# Altium PCB PWR Board 10A.PcbDoc (part 4 of 10)
Units mm, origin at the board's own origin, x right, y up, seen from the top; angles counter-clockwise.
Board outline 355 x 325 mm, 4 copper layers (Top Layer, Layer 1, Layer 2, Bottom Layer), stack 1.636 mm thick; 617 components, 308 nets, 1518 pads, 1199 vias.
Unrouted connection lines stored in the file: 361.
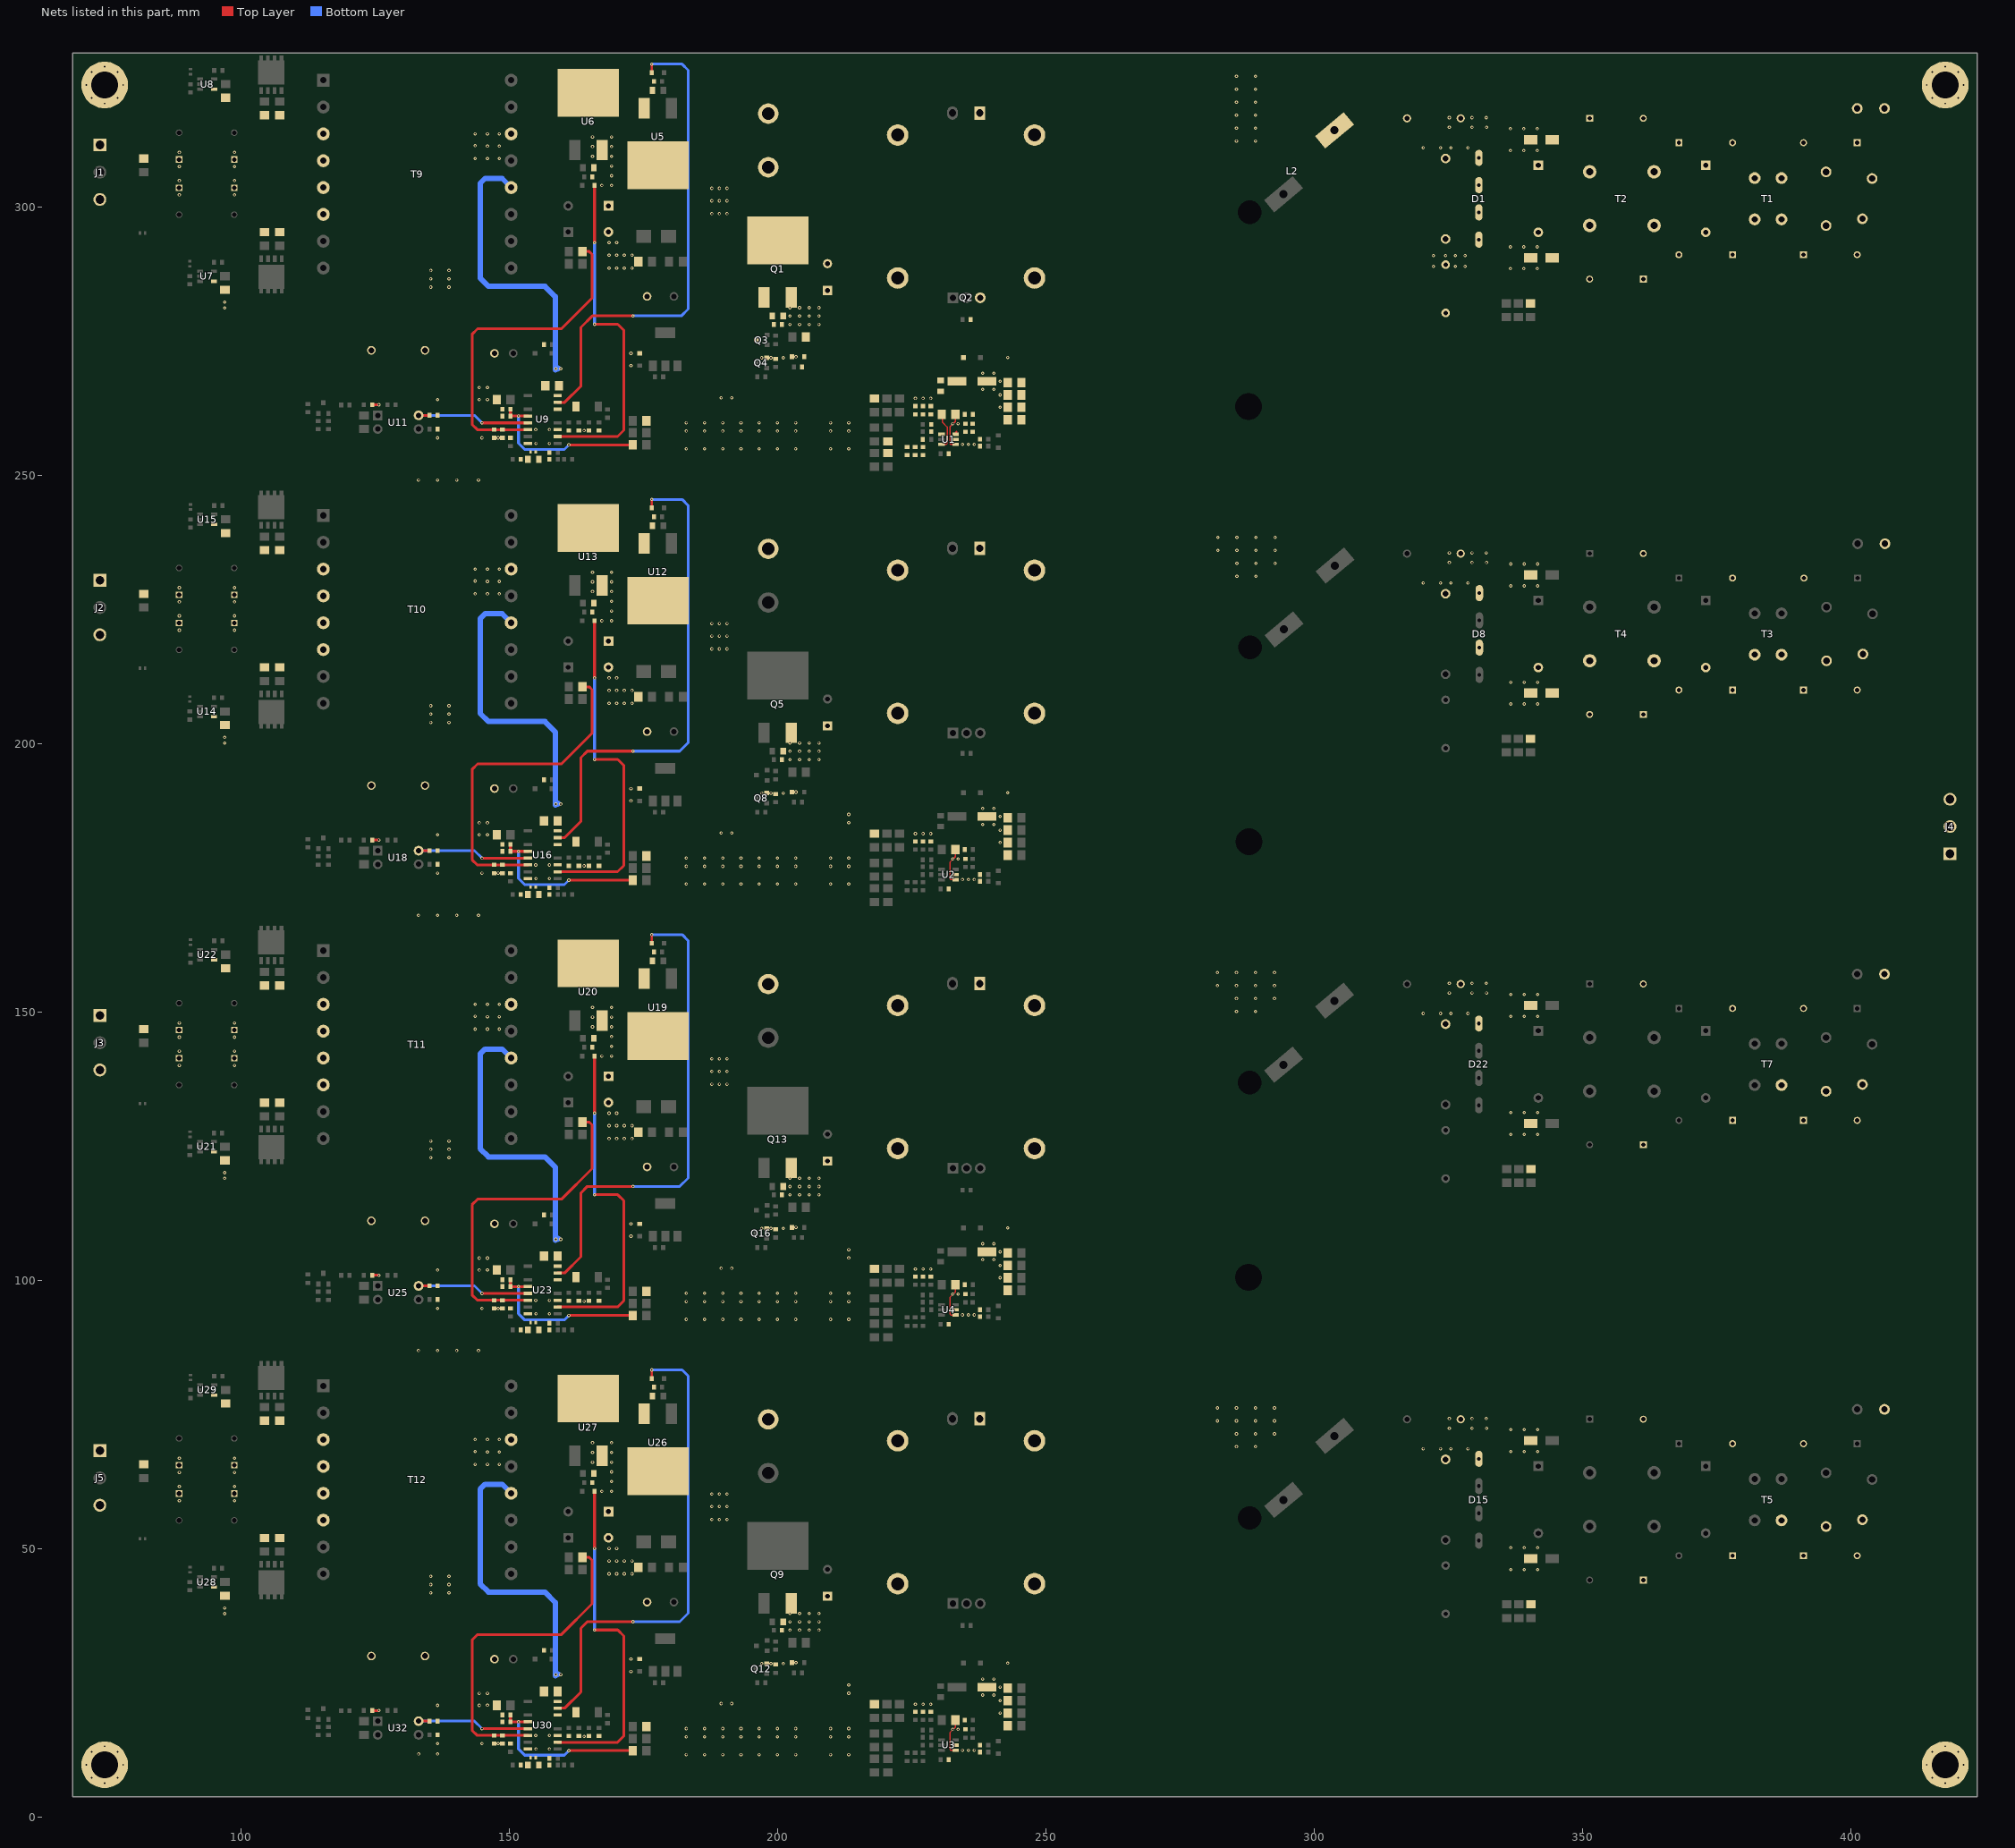
[diagram p4: the nets of this part, all layers, seen from the top]

## Part data (continued)
L2 L4 L6 L8: library part 760801401, "FIXED IND 118UH 13.9A 0.022OHM", Manufacturer="Wurth Electronics", Supplier Part Number=732-760801401-ND, Item Type=Inductors, Manufacturer Part Number=760801401, Pricing="1=18.9, 5=17.01, 10=15.12, 20=14.175, 100=13.2301 (USD)", RoHS=No, Stock=36, Supplier=Digikey
NT1 NT2 NT3 NT4: "Net Tie SMD", Manufacturer Part Number="Net Tie", Item Type="Net Tie Pad"
Q1 Q5 Q9 Q13: "MOSFET N-CH 600V 20A D2PAK", LCSC Part Number=C2688646, Manufacturer=STMicroelectronics, ComponentLink1Description=https://datasheet.ciiva.com/25625/0900766b810ea17c-25625320.pdf?src-supplier=Rs, ComponentLink1URL=https://datasheet.ciiva.com/25625/0900766b810ea17c-25625320.pdf?src-supplier=Rs, ComponentLink2Description=https://datasheet.ciiva.com/6368/cd00232934-6368742.pdf?src-supplier=Digikey, ComponentLink2URL=https://datasheet.ciiva.com/6368/cd00232934-6368742.pdf?src-supplier=Digikey, ComponentLink3Description=https://datasheet.ciiva.com/6368/cd00232934-6368743.pdf?src-supplier=Digikey, ComponentLink3URL=https://datasheet.ciiva.com/6368/cd00232934-6368743.pdf?src-supplier=Digikey, ComponentLink4Description=https://datasheet.ciiva.com/940/cd00232934-940186.pdf?src-supplier=Digikey, ComponentLink4URL=https://datasheet.ciiva.com/940/cd00232934-940186.pdf?src-supplier=Digikey, ComponentLink5Description=https://datasheet.ciiva.com/16490/cd00232934-16490237.pdf?src-supplier=Future+Electronics, ComponentLink5URL=https://datasheet.ciiva.com/16490/cd00232934-16490237.pdf?src-supplier=Future+Electronics, Item Type=MOSFETs, Manufacturer Part Number=STB26NM60N, Pricing="1=5.74, 10=3.91, 50=3.91, 100=3.5, 1000=3.49, 10000=3.49 (USD)", RoHS=Yes, Stock=642, Supplier=Mouser
Q2 Q6 Q10 Q14: "MOSFET N-CH 600V 22A TO220-3", LCSC Part Number=C537192, Manufacturer=Infineon, ComponentLink1Description=http://www.mouser.com/ds/2/196/Infineon-IPP60R099C7-DS-v02_00-EN-1076845.pdf?src-supplier=Mouser, ComponentLink1URL=http://www.mouser.com/ds/2/196/Infineon-IPP60R099C7-DS-v02_00-EN-1076845.pdf?src-supplier=Mouser, ComponentLink2Description=https://www.infineon.com/dgdl/Infineon-IPP60R099C7-DS-v02_00-EN.pdf?fileId=5546d4624cb7f111014d481216877004&src-supplier=Digikey, ComponentLink2URL=https://www.infineon.com/dgdl/Infineon-IPP60R099C7-DS-v02_00-EN.pdf?fileId=5546d4624cb7f111014d481216877004&src-supplier=Digikey, Item Type=MOSFETs, Manufacturer Part Number=IPP60R099C7XKSA1, Pricing="1=5.39, 10=4.84, 50=4.78, 100=4.69, 1000=2.27, 10000=2.27 (USD)", RoHS=Yes, Stock=617, Supplier=Mouser
Q3 Q7 Q11 Q15: "MOSFET P-CH 60V 1.6A SOT23-3", Case/Package=SOT-23-3, Continuous Drain Current (ID)=1.2A, Drain to Source Resistance=345mR, Drain to Source Voltage (Vdss)=60V, Gate to Source Voltage (Vgs)=20V, Input Capacitance=210pF, LCSC Part Number=C553975, Manufacturer="Vishay Siliconix", Max Operating Temperature=150°C, Max Power Dissipation=1.7W, Min Operating Temperature=-55°C, Package Quantity=3000, Power Dissipation=1W, Threshold Voltage=-1V, ComponentLink1Description=https://datasheet.ciiva.com/16217/si2309cd-16217597.pdf?src-supplier=Future+Electronics, ComponentLink1URL=https://datasheet.ciiva.com/16217/si2309cd-16217597.pdf?src-supplier=Future+Electronics, ComponentLink2Description=https://datasheet.ciiva.com/29742/si2309cd-29742879.pdf?src-supplier=Digikey, ComponentLink2URL=https://datasheet.ciiva.com/29742/si2309cd-29742879.pdf?src-supplier=Digikey, Drain-source On Resistance-Max=345mR, Fall Time=35ns, Height=1.02mm, Item Type=MOSFETs, Lead Free="Lead Free", Length=3.04mm, Manufacturer Part Number=SI2309CDS-T1-E3, Mounting Technology="Surface Mount", Number of Channels=1, Packaging="Tape and Reel", Pins=3, Polarity=P-CHANNEL, Pricing="1=0.53, 10=0.453, 50=0.453, 100=0.316, 1000=0.2, 10000=0.157 (USD)", Radiation Hardening=No, Rds On Max=345mR, Rise Time=35ns, RoHS=Yes, RoHS Compliant=Yes, Series=TrenchFET®, Stock=57582, Supplier=Mouser, Turn-Off Delay Time=15ns, Turn-On Delay Time=40ns, Weight=0.050717oz, Width=1.4mm
Q4 Q8 Q12 Q16: "TRANS NPN 40V 0.6A SOT23-3", LCSC Part Number=C151826, Manufacturer=Diodes, ComponentLink1Description=https://datasheet.ciiva.com/15139/getdatasheetpartid-91436-15139165.pdf?src-supplier=Verical, ComponentLink1URL=https://datasheet.ciiva.com/15139/getdatasheetpartid-91436-15139165.pdf?src-supplier=Verical, ComponentLink2Description=https://datasheet.ciiva.com/972/ds30039-972547.pdf?src-supplier=Digikey, ComponentLink2URL=https://datasheet.ciiva.com/972/ds30039-972547.pdf?src-supplier=Digikey, ComponentLink3Description=https://datasheet.ciiva.com/972/ds30039-972548.pdf?src-supplier=Digikey, ComponentLink3URL=https://datasheet.ciiva.com/972/ds30039-972548.pdf?src-supplier=Digikey, ComponentLink4Description=https://datasheet.ciiva.com/972/ds30039-972549.pdf?src-supplier=Digikey, ComponentLink4URL=https://datasheet.ciiva.com/972/ds30039-972549.pdf?src-supplier=Digikey, ComponentLink5Description=https://datasheet.ciiva.com/11201/ds30039-11201820.pdf?src-supplier=Avnet, ComponentLink5URL=https://datasheet.ciiva.com/11201/ds30039-11201820.pdf?src-supplier=Avnet, ComponentLink6Description=https://datasheet.ciiva.com/16199/ds30039-16199054.pdf?src-supplier=Future+Electronics, ComponentLink6URL=https://datasheet.ciiva.com/16199/ds30039-16199054.pdf?src-supplier=Future+Electronics, Item Type=BJTs, Manufacturer Part Number=MMBT4401-7-F, Pricing="3000=0.0119, 12000=0.0113, 30000=0.011, 75000=0.0107, 120000=0.0102 (USD)", RoHS=Yes, Stock=1359000, Supplier="Future Electronics"
Q17 Q19 Q20 Q22 Q23 Q25 Q26 Q28: "MOSFET N-CH 80V 100A 8VSON", LCSC Part Number=C2864118, Manufacturer="Texas Instruments", Package="8-VSON-CLIP (5x6)", ComponentLink1Description=LCSC, ComponentLink1URL=https://jlcpcb.com/partdetail/TexasInstruments-CSD19502Q5B/C2864118, Item Type=Mosfet, Manufacturer Part Number=CSD19502Q5B
Q18 Q21 Q24 Q27: "TRANS NPN 60V 3A SOT223-3", Case/Package=SOT-223, Clock Frequency=175MHz, Collector Base Voltage (VCBO)=80V, Collector Emitter Breakdown Voltage=60V, Collector Emitter Saturation Voltage=430mV, Collector-emitter Voltage-Max=600mV, Continuous Collector Current=3A, Emitter Base Voltage (VEBO)=5V, LCSC Part Number=C24098, Manufacturer="Diodes Zetex", Max Operating Temperature=150°C, Max Power Dissipation=2W, Min Operating Temperature=-55°C, Package Quantity=1, Collector Emitter Voltage (VCEO)=60V, ComponentLink1Description=https://datasheet.ciiva.com/5782/73067-5782650.pdf?src-supplier=Farnell, ComponentLink1URL=https://datasheet.ciiva.com/5782/73067-5782650.pdf?src-supplier=Farnell, ComponentLink2Description=https://datasheet.ciiva.com/8029/73067-8029643.pdf?src-supplier=Element14, ComponentLink2URL=https://datasheet.ciiva.com/8029/73067-8029643.pdf?src-supplier=Element14, ComponentLink3Description=https://datasheet.ciiva.com/4723/fzt651-4723319.pdf?src-supplier=Mouser, ComponentLink3URL=https://datasheet.ciiva.com/4723/fzt651-4723319.pdf?src-supplier=Mouser, ComponentLink4Description=https://datasheet.ciiva.com/975/fzt651-975544.pdf?src-supplier=Digikey, ComponentLink4URL=https://datasheet.ciiva.com/975/fzt651-975544.pdf?src-supplier=Digikey, Current=3A, Current Rating=3A, Frequency=175MHz, Gain Bandwidth Product=175MHz, Height=1.65mm, hFE Min=100, Item Type=BJTs, Lead Free="Lead Free", Length=6.7mm, Manufacturer Part Number=FZT651TA, Max Breakdown Voltage=60V, Max Collector Current=3A, Mounting Technology="Surface Mount", Number of Elements=1, Packaging="Tape and Reel", Pins=4, Polarity=NPN, Power Dissipation=2W, Pricing="1000=0.265, 3000=0.255, 4000=0.25, 10000=0.245, 15000=0.24 (USD)", Radiation Hardening=No, Reach SVHC Compliant=No, RoHS=Yes, RoHS Compliant=Yes, Series=-, Stock=670000, Supplier="Future Electronics", Termination=SMD/SMT, Transition Frequency=175MHz, Voltage=60V, Voltage Rating (DC)=60V, Weight=0.000282oz, Width=3.7mm
R1 R4 R27 R30 R53 R56 R79 R82: library part RC1206FR-073M09L, "RES 3.09M OHM 1% 1/4W 1206", Case Code (Imperial)=1206, Case Code (Metric)=3216, LCSC Part Number=C488771, Manufacturer=Yageo, Max Operating Temperature=155°C, Max Power Dissipation=250mW, Min Operating Temperature=-55°C, Package Quantity=1, Temperature Coefficient=100ppm/°C, Tolerance=1%, Voltage Rating (DC)=200V, Case/Package=1206, ComponentLink1Description=https://datasheet.ciiva.com/2461/pyu-rc1206-51-rohs-l-4-2461290.pdf?src-supplier=Digikey, ComponentLink1URL=https://datasheet.ciiva.com/2461/pyu-rc1206-51-rohs-l-4-2461290.pdf?src-supplier=Digikey, ComponentLink2Description=https://datasheet.ciiva.com/2461/pyu-rc1206-51-rohs-l-4-2461291.pdf?src-supplier=Digikey, ComponentLink2URL=https://datasheet.ciiva.com/2461/pyu-rc1206-51-rohs-l-4-2461291.pdf?src-supplier=Digikey, ComponentLink3Description=https://datasheet.ciiva.com/2461/pyu-rc1206-51-rohs-l-4-2461292.pdf?src-supplier=Digikey, ComponentLink3URL=https://datasheet.ciiva.com/2461/pyu-rc1206-51-rohs-l-4-2461292.pdf?src-supplier=Digikey, Contact Plating=Tin,Matte, Features="Moisture Resistant", Height=0.026inch, Item Type=Resistor, Lead Free="Lead Free", Length=0.122inch, Manufacturer Part Number=RC1206FR-073M09L, Number of Terminations=2, Packaging="Cut Tape", Pricing="1=0.1, 10=0.025, 50=0.025, 100=0.015, 1000=0.013, 10000=0.01 (USD)", RoHS=Yes, RoHS Compliant=Yes, Series=RC, Stock=10394, Supplier=Mouser, Width=0.063inch
R2 R28 R54 R80: library part RC0805FR-071ML, "RES 1M OHM 1% 1/8W 0805", Case Code (Imperial)=0805, Case Code (Metric)=2012, Case/Package=Molded, LCSC Part Number=C107700, Manufacturer=Yageo, Max Operating Temperature=155°C, Min Operating Temperature=-55°C, Power Rating=125mW, Resistance Tolerance=1%, Resistor Type="Thick Film", Supplier Part Number=7283393, Temperature Coefficient=250ppm/°C, Voltage Rating=150V, Category="Chip SMD Resistors", Construction=Rectangular, Depth=1.25mm, Item Type=Resistor, Lead Free="Lead Free", Length=2mm, Manufacturer Part Number=RC0805FR-071ML, Military Standard=Not, Packaging="Tape and Reel", Pricing="5000=0.0027, 25000=0.0025, 125000=0.0024, 500000=0.0023, 1250000=0.0021 (USD)", Reach SVHC Compliant=Unknown, RoHS=Yes, RoHS Compliant=Yes, Stock=2655000, Supplier="Future Electronics", Tolerance=1%, Voltage Rating (AC)=150V
R3 R6 R7 R10 R29 R32 R33 R36 R55 R58 R59 R62 R81 R84 R85 R88: library part RC1206FR-073M3L, "RES 3.3M OHM 1% 1/4W 1206", LCSC Part Number=C137288, Manufacturer=Yageo, Voltage Rating (AC)=200V, ComponentLink1Description=https://datasheet.ciiva.com/11809/0900766b80c6630a-11809505.pdf?src-supplier=Rs, ComponentLink1URL=https://datasheet.ciiva.com/11809/0900766b80c6630a-11809505.pdf?src-supplier=Rs, ComponentLink2Description=https://datasheet.ciiva.com/2511/pyu-rc1206-51-rohs-l-4-2511094.pdf?src-supplier=Digikey, ComponentLink2URL=https://datasheet.ciiva.com/2511/pyu-rc1206-51-rohs-l-4-2511094.pdf?src-supplier=Digikey, ComponentLink3Description=https://datasheet.ciiva.com/2511/pyu-rc1206-51-rohs-l-4-2511095.pdf?src-supplier=Digikey, ComponentLink3URL=https://datasheet.ciiva.com/2511/pyu-rc1206-51-rohs-l-4-2511095.pdf?src-supplier=Digikey, ComponentLink4Description=https://datasheet.ciiva.com/2511/pyu-rc1206-51-rohs-l-4-2511096.pdf?src-supplier=Digikey, ComponentLink4URL=https://datasheet.ciiva.com/2511/pyu-rc1206-51-rohs-l-4-2511096.pdf?src-supplier=Digikey, ComponentLink5Description=https://datasheet.ciiva.com/17420/pyu-rc1206-51-rohs-l-4-17420140.pdf?src-supplier=Future+Electronics, ComponentLink5URL=https://datasheet.ciiva.com/17420/pyu-rc1206-51-rohs-l-4-17420140.pdf?src-supplier=Future+Electronics, Item Type=Resistor, Manufacturer Part Number=RC1206FR-073M3L, Pricing="5000=0.0038, 20000=0.0036, 75000=0.0034, 200000=0.0032, 500000=0.003 (USD)", RoHS=Yes, Stock=130000, Supplier="Future Electronics"
R5 R31 R57 R83 R105 R110 R135 R140 R165 R170 R195 R200: library part CRCW060310R0FKEA, "RES SMD 10 OHM 1% 1/10W 0603", Case Code (Imperial)=0603, Case Code (Metric)=1608, LCSC Part Number=C844919, Manufacturer=Vishay, Max Operating Temperature=155°C, Max Power Dissipation=100mW, Min Operating Temperature=-55°C, Package Quantity=10, Resistance Tolerance=1%, Resistor Type="Thick Film", Temperature Coefficient=100ppm/°C, Voltage Rating=75V, Case/Package=0603, ComponentLink1Description=https://datasheet.ciiva.com/11808/0900766b80d98afc-11808660.pdf?src-supplier=Rs, ComponentLink1URL=https://datasheet.ciiva.com/11808/0900766b80d98afc-11808660.pdf?src-supplier=Rs, ComponentLink2Description=https://datasheet.ciiva.com/26316/fld-crcw-e3-data-en-26316582.pdf?src-supplier=Distrelec, ComponentLink2URL=https://datasheet.ciiva.com/26316/fld-crcw-e3-data-en-26316582.pdf?src-supplier=Distrelec, ComponentLink3Description=https://datasheet.ciiva.com/2465/dcrcwe3-2465700.pdf?src-supplier=Digikey, ComponentLink3URL=https://datasheet.ciiva.com/2465/dcrcwe3-2465700.pdf?src-supplier=Digikey, ComponentLink4Description=https://datasheet.ciiva.com/16781/70201119-16781847.pdf?src-supplier=Allied+Electronics, ComponentLink4URL=https://datasheet.ciiva.com/16781/70201119-16781847.pdf?src-supplier=Allied+Electronics, ComponentLink5Description=https://datasheet.ciiva.com/22673/1697337-22673071.pdf?src-supplier=Element14, ComponentLink5URL=https://datasheet.ciiva.com/22673/1697337-22673071.pdf?src-supplier=Element14, ComponentLink6Description=https://datasheet.ciiva.com/2465/dcrcwe3-2465701.pdf?src-supplier=Digikey, ComponentLink6URL=https://datasheet.ciiva.com/2465/dcrcwe3-2465701.pdf?src-supplier=Digikey, ComponentLink7Description=https://datasheet.ciiva.com/2465/dcrcwe3-2465699.pdf?src-supplier=Digikey, ComponentLink7URL=https://datasheet.ciiva.com/2465/dcrcwe3-2465699.pdf?src-supplier=Digikey, ComponentLink8Description=https://datasheet.ciiva.com/5547/dcrcwe3-109170-5547342.pdf?src-supplier=Mouser, ComponentLink8URL=https://datasheet.ciiva.com/5547/dcrcwe3-109170-5547342.pdf?src-supplier=Mouser, Construction=Rectangular, Contact Plating=Tin, Depth=0.85mm, Features="Automotive AEC-Q200", Height=0.45mm, Item Type=Resistors, Lead Free=5697LeadFree, Length=1.55mm, Manufacturer Part Number=CRCW060310R0FKEA, Military Standard=Not, Number of Terminations=2, Packaging="Tape and Reel", Pins=2, Power Rating=100mW, Pricing="1=0.1, 10=0.017, 50=0.017, 100=0.01, 1000=0.008, 10000=0.005 (USD)", Reach SVHC Compliant=Unknown, RoHS=Yes, RoHS Compliant=Yes, Series=CRCW, Stock=648208, Supplier=Mouser, Technology="THICK FILM", Termination=SMD/SMT, Tolerance=1%, Voltage Rating (DC)=75V, Weight=7.1E-05oz, Width=0.033inch
R8 R34 R60 R86: library part CRCW06031R00FKEA, "RES SMD 1 OHM 1% 1/10W 0603", Case Code (Imperial)=0603, Case Code (Metric)=1608, LCSC Part Number=C844752, Manufacturer="Vishay Dale", Max Operating Temperature=155°C, Max Power Dissipation=100mW, Min Operating Temperature=-55°C, Package Quantity=5000, Ratings=AEC-Q200, Resistance Tolerance=1%, Resistor Type="Thick Film", Temperature Coefficient=100ppm/°C, Voltage Rating=75V, Case/Package=0603, ComponentLink1Description=https://datasheet.ciiva.com/7792/1359337-7792119.pdf?src-supplier=Element14, ComponentLink1URL=https://datasheet.ciiva.com/7792/1359337-7792119.pdf?src-supplier=Element14, ComponentLink2Description=https://datasheet.ciiva.com/3257/dcrcwe3-3257225.pdf?src-supplier=Avnet, ComponentLink2URL=https://datasheet.ciiva.com/3257/dcrcwe3-3257225.pdf?src-supplier=Avnet, ComponentLink3Description=https://datasheet.ciiva.com/2465/dcrcwe3-2465530.pdf?src-supplier=Digikey, ComponentLink3URL=https://datasheet.ciiva.com/2465/dcrcwe3-2465530.pdf?src-supplier=Digikey, ComponentLink4Description=https://datasheet.ciiva.com/2465/dcrcwe3-2465528.pdf?src-supplier=Digikey, ComponentLink4URL=https://datasheet.ciiva.com/2465/dcrcwe3-2465528.pdf?src-supplier=Digikey, ComponentLink5Description=https://datasheet.ciiva.com/5541/dcrcwe3-109170-5541726.pdf?src-supplier=Mouser, ComponentLink5URL=https://datasheet.ciiva.com/5541/dcrcwe3-109170-5541726.pdf?src-supplier=Mouser, Construction=Rectangular, Contact Plating=Tin, Depth=0.85mm, Features="Automotive AEC-Q200", Height=0.45mm, Item Type=Resistor, Lead Free=5697LeadFree, Length=1.55mm, Manufacturer Part Number=CRCW06031R00FKEA, Military Standard=Not, Number of Terminations=2, Packaging="Tape and Reel", Pins=2, Power Rating=100mW, Pricing="1=0.1, 10=0.024, 50=0.024, 100=0.014, 1000=0.011, 10000=0.006 (USD)", Radiation Hardening=No, Reach SVHC Compliant=Unknown, RoHS=Yes, RoHS Compliant=Yes, Series=CRCW, Stock=303523, Supplier=Mouser, Termination=SMD/SMT, Tolerance=1%, Voltage Rating (DC)=75V, Weight=7.1E-05oz, Width=0.85mm
R9 R35 R61 R87: library part RC0603FR-0782K5L, "RES 82.5K OHM 1% 1/10W 0603", LCSC Part Number=C185310, Manufacturer=Yageo, Voltage Rating (DC)=50V, ComponentLink1Description=https://datasheet.ciiva.com/2519/pyu-r-int-thick-7-2519111.pdf?src-supplier=Digikey, ComponentLink1URL=https://datasheet.ciiva.com/2519/pyu-r-int-thick-7-2519111.pdf?src-supplier=Digikey, ComponentLink2Description=https://datasheet.ciiva.com/2519/pyu-r-int-thick-7-2519112.pdf?src-supplier=Digikey, ComponentLink2URL=https://datasheet.ciiva.com/2519/pyu-r-int-thick-7-2519112.pdf?src-supplier=Digikey, ComponentLink3Description=https://datasheet.ciiva.com/2519/pyu-r-int-thick-7-2519113.pdf?src-supplier=Digikey, ComponentLink3URL=https://datasheet.ciiva.com/2519/pyu-r-int-thick-7-2519113.pdf?src-supplier=Digikey, Item Type=Resistor, Lead Free=5697LeadFree, Manufacturer Part Number=RC0603FR-0782K5L, Pricing="5000=0.00112 (USD)", RoHS=Yes, Stock=165000, Supplier=Avnet
R11 R37 R63 R89: library part RC0603FR-0736K5L, "RES 36.5K OHM 1% 1/10W 0603", LCSC Part Number=C137738, Manufacturer=YAGEO, Package=0603, ComponentLink1Description=LCSC, ComponentLink1URL=https://www.lcsc.com/product-detail/Chip-Resistor-Surface-Mount_YAGEO-RC0603FR-0736K5L_C137738.html, Item Type=Resistor, Manufacturer Part Number=RC0603FR-0736K5L
R12 R38 R64 R90: library part RC0603FR-07120KL, "RES 120K OHM 1% 1/10W 0603", Case Code (Imperial)=0603, Case Code (Metric)=1608, LCSC Part Number=C114607, Manufacturer=Yageo, Max Operating Temperature=155°C, Max Power Dissipation=100mW, Min Operating Temperature=-55°C, Package Quantity=5000, Resistance Tolerance=1%, Resistor Type="Thick Film", Temperature Coefficient=100ppm/°C, Voltage Rating=50V, Working Voltage=75V, Case/Package=0603, ComponentLink1Description=https://datasheet.ciiva.com/11808/0900766b80f96399-11808757.pdf?src-supplier=Rs, ComponentLink1URL=https://datasheet.ciiva.com/11808/0900766b80f96399-11808757.pdf?src-supplier=Rs, ComponentLink2Description=https://datasheet.ciiva.com/2454/pyu-r-int-thick-7-2454739.pdf?src-supplier=Digikey, ComponentLink2URL=https://datasheet.ciiva.com/2454/pyu-r-int-thick-7-2454739.pdf?src-supplier=Digikey, ComponentLink3Description=https://datasheet.ciiva.com/2454/pyu-r-int-thick-7-2454740.pdf?src-supplier=Digikey, ComponentLink3URL=https://datasheet.ciiva.com/2454/pyu-r-int-thick-7-2454740.pdf?src-supplier=Digikey, ComponentLink4Description=https://datasheet.ciiva.com/2454/pyu-r-int-thick-7-2454738.pdf?src-supplier=Digikey, ComponentLink4URL=https://datasheet.ciiva.com/2454/pyu-r-int-thick-7-2454738.pdf?src-supplier=Digikey, ComponentLink5Description=https://datasheet.ciiva.com/7746/443971-7746247.pdf?src-supplier=Element14, ComponentLink5URL=https://datasheet.ciiva.com/7746/443971-7746247.pdf?src-supplier=Element14, ComponentLink6Description=https://datasheet.ciiva.com/7746/443971-7746246.pdf?src-supplier=Element14, ComponentLink6URL=https://datasheet.ciiva.com/7746/443971-7746246.pdf?src-supplier=Element14, Depth=0.8mm, Features="Moisture Resistant", Height=0.022inch, Item Type=Resistors, Lead Free=5697LeadFree, Lead Pitch=2.54mm, Length=0.063inch, Manufacturer Part Number=RC0603FR-07120KL, Number of Terminations=2, Packaging="Tape and Reel", Pins=2, Power Rating=100mW, Pricing="5000=0.0022, 50000=0.0021, 150000=0.0021, 375000=0.002, 1000000=0.0019 (USD)", Radiation Hardening=5898YesNo, Reach SVHC Compliant=Unknown, RoHS=Yes, RoHS Compliant=Yes, Series=RC, Stock=3405000, Supplier="Future Electronics", Technology="THICK FILM", Termination=SMD/SMT, Tolerance=1%, Voltage Rating (AC)=50V, Voltage Rating (DC)=50V, Width=0.031inch
R13 R39 R65 R91: library part RC0603FR-073KL, "RES 3K OHM 1% 1/10W 0603", Case Code (Imperial)=0603, Case Code (Metric)=1608, LCSC Part Number=C126358, Manufacturer=Yageo, Max Operating Temperature=155°C, Max Power Dissipation=100mW, Min Operating Temperature=-55°C, Resistance Tolerance=1%, Resistor Type="Thick Film", Temperature Coefficient=100ppm/°C, Voltage Rating=50V, Case/Package=0603, ComponentLink1Description=http://www.farnell.com/datasheets/2167052.pdf?src-supplier=Farnell, ComponentLink1URL=http://www.farnell.com/datasheets/2167052.pdf?src-supplier=Farnell, ComponentLink2Description=http://www.mouser.com/ds/2/447/RC0603-272842.pdf?src-supplier=Mouser, ComponentLink2URL=http://www.mouser.com/ds/2/447/RC0603-272842.pdf?src-supplier=Mouser, ComponentLink3Description=https://www.verical.com/server-webapp/html/getDatasheet?partID=135099&src-supplier=Verical, ComponentLink3URL=https://www.verical.com/server-webapp/html/getDatasheet?partID=135099&src-supplier=Verical, ComponentLink4Description=http://www.farnell.com/datasheets/2167052.pdf?src-supplier=Element14, ComponentLink4URL=http://www.farnell.com/datasheets/2167052.pdf?src-supplier=Element14, ComponentLink5Description=http://www.yageo.com/documents/recent/PYu-RC_Group_51_RoHS_L_10.pdf?src-supplier=Digikey, ComponentLink5URL=http://www.yageo.com/documents/recent/PYu-RC_Group_51_RoHS_L_10.pdf?src-supplier=Digikey, ComponentLink6Description=http://www.yageo.com/documents/recent/PYu-RC_Group_51_RoHS_L_9.pdf?src-supplier=Digikey, ComponentLink6URL=http://www.yageo.com/documents/recent/PYu-RC_Group_51_RoHS_L_9.pdf?src-supplier=Digikey, ComponentLink7Description=https://datasheet.octopart.com/RC0603FR-073KL-Yageo-datasheet-8328172.pdf?src-supplier=Farnell, ComponentLink7URL=https://datasheet.octopart.com/RC0603FR-073KL-Yageo-datasheet-8328172.pdf?src-supplier=Farnell, ComponentLink8Description=http://www.yageo.com/documents/recent/PYu-RC0603_51_RoHS_L_7.pdf?src-supplier=Future+Electronics, ComponentLink8URL=http://www.yageo.com/documents/recent/PYu-RC0603_51_RoHS_L_7.pdf?src-supplier=Future+Electronics, ComponentLink9Description=https://datasheet.octopart.com/RC0603FR-073KL-Yageo-datasheet-34211833.pdf?src-supplier=Element14, ComponentLink9URL=https://datasheet.octopart.com/RC0603FR-073KL-Yageo-datasheet-34211833.pdf?src-supplier=Element14, ComponentLink10Description=http://www.farnell.com/datasheets/1868787.pdf?src-supplier=Newark, ComponentLink10URL=http://www.farnell.com/datasheets/1868787.pdf?src-supplier=Newark, ComponentLink11Description=https://datasheet.octopart.com/RC0603FR-073KL-Yageo-datasheet-164759695.pdf?src-supplier=Future+Electronics, ComponentLink11URL=https://datasheet.octopart.com/RC0603FR-073KL-Yageo-datasheet-164759695.pdf?src-supplier=Future+Electronics, Construction=Rectangular, Depth=0.8mm, Features="Moisture Resistant", Item Type=Resistor, Lead Free=5697LeadFree, Length=1.6mm, Manufacturer Part Number=RC0603FR-073KL, Military Standard=Not, Number of Terminations=2, Packaging="Tape and Reel", Pins=2NUMBER, Power Rating=100mW, Reach SVHC Compliant=No, RoHS=Yes, RoHS Compliant=Yes, Series=RC, Supplier=Avnet, Termination=SMD/SMT, Tolerance=1%, Voltage Rating (DC)=50V, Width=800um
R14 R40 R66 R92: library part CRCW080510R0FKEAHP, "RES SMD 10 OHM 1% 1/2W 0805", Case Code (Imperial)=0805, Case Code (Metric)=2012, LCSC Part Number=C844598, Manufacturer=Vishay, Max Operating Temperature=155°C, Max Power Dissipation=333mW, Min Operating Temperature=-55°C, Package Quantity=5000, Power Rating=330mW, Ratings=AEC-Q200, Resistance Tolerance=1%, Resistor Type="Thick Film", Temperature Coefficient=100ppm/°C, Voltage Rating=150V, Case/Package=0805, ComponentLink1Description=http://www.farnell.com/datasheets/2884039.pdf?src-supplier=Newark, ComponentLink1URL=http://www.farnell.com/datasheets/2884039.pdf?src-supplier=Newark, ComponentLink2Description=https://datasheet.octopart.com/CRCW080510R0FKEAHP-Vishay-datasheet-87136057.pdf?src-supplier=Newark, ComponentLink2URL=https://datasheet.octopart.com/CRCW080510R0FKEAHP-Vishay-datasheet-87136057.pdf?src-supplier=Newark, ComponentLink3Description=http://www.vishay.com/docs/20043/crcwhpe3.pdf?src-supplier=Digikey, ComponentLink3URL=http://www.vishay.com/docs/20043/crcwhpe3.pdf?src-supplier=Digikey, Construction=Rectangular, Contact Plating=Tin, Depth=1.25mm, Features="Automotive AEC-Q200", Height=0.5mm, Item Type=Resistor, Lead Free="Lead Free", Length=2mm, Manufacturer Part Number=CRCW080510R0FKEAHP, Military Standard=Not, Number of Terminations=2, Packaging="Tape and Reel", Pricing="1=0.19, 10=0.066, 50=0.066, 100=0.04, 1000=0.027, 10000=0.023 (USD)", Radiation Hardening=No, Reach SVHC Compliant=Unknown, RoHS=Yes, RoHS Compliant=Yes, Series=CRCW-HP, Stock=384044, Supplier=Mouser, Technology="THICK FILM", Termination=SMD/SMT, Tolerance=1%, Voltage Rating (DC)=150V, Weight=0.000194oz, Width=1.2mm
R15 R41 R67 R93: library part RC0603FR-0724K3L, "RES 24.3K OHM 1% 1/10W 0603", Manufacturer=Yageo, Supplier Part Number=6938161, Voltage Rating (DC)=50V, ComponentLink1Description=https://datasheet.ciiva.com/15189/getdatasheetpartid-326710-15189669.pdf?src-supplier=Verical, ComponentLink1URL=https://datasheet.ciiva.com/15189/getdatasheetpartid-326710-15189669.pdf?src-supplier=Verical, Item Type=Resistors, Lead Free=5697LeadFree, Manufacturer Part Number=RC0603FR-0724K3L, Pricing="5000=0.0015, 50000=0.0014, 150000=0.0014, 375000=0.0013, 1000000=0.0012 (USD)", RoHS=Yes, Stock=440000, Supplier="Future Electronics"
R16 R42 R68 R94: library part CRCW0603100KFKEA, "RES SMD 100K OHM 1% 1/10W 0603", Case Code (Imperial)=0603, Case Code (Metric)=1608, Case/Package=345Case, LCSC Part Number=C844916, Max Operating Temperature=155°C, Min Operating Temperature=-55°C, Power Rating=100mW, Resistance Tolerance=1%, Resistor Type="Thick Film", Supplier Part Number=71-CRCW0603-100K-E3, Temperature Coefficient=100ppm/°C, Voltage Rating=75V, Category="Chip SMD Resistors", ComponentLink1Description=LCSC, ComponentLink2Description=http://www.farnell.com/datasheets/2310790.pdf?src-supplier=Farnell, ComponentLink2URL=http://www.farnell.com/datasheets/2310790.pdf?src-supplier=Farnell, ComponentLink3Description=https://datasheet.octopart.com/CRCW0603100KFKEA-Vishay-datasheet-14722531.pdf?src-supplier=Newark, ComponentLink3URL=https://datasheet.octopart.com/CRCW0603100KFKEA-Vishay-datasheet-14722531.pdf?src-supplier=Newark, ComponentLink4Description=https://www.vishay.com/docs/20035/dcrcwe3.pdf?src-supplier=Digi-Key, ComponentLink4URL=https://www.vishay.com/docs/20035/dcrcwe3.pdf?src-supplier=Digi-Key, ComponentLink5Description=https://datasheet.octopart.com/CRCW0603100KFKEA-Vishay-datasheet-5300368.pdf?src-supplier=Future+Electronics, ComponentLink5URL=https://datasheet.octopart.com/CRCW0603100KFKEA-Vishay-datasheet-5300368.pdf?src-supplier=Future+Electronics, ComponentLink6Description=http://www.farnell.com/datasheets/2310790.pdf?src-supplier=Newark, ComponentLink6URL=http://www.farnell.com/datasheets/2310790.pdf?src-supplier=Newark, ComponentLink7Description=http://www.farnell.com/datasheets/2310790.pdf?src-supplier=Element14, ComponentLink7URL=http://www.farnell.com/datasheets/2310790.pdf?src-supplier=Element14, ComponentLink8Description=https://datasheet.octopart.com/CRCW0603100KFKEA-Vishay-datasheet-83961561.pdf?src-supplier=Element14, ComponentLink8URL=https://datasheet.octopart.com/CRCW0603100KFKEA-Vishay-datasheet-83961561.pdf?src-supplier=Element14, ComponentLink9Description=https://datasheet.octopart.com/CRCW0603100KFKEA-Vishay-datasheet-8363642.pdf?src-supplier=Verical, ComponentLink9URL=https://datasheet.octopart.com/CRCW0603100KFKEA-Vishay-datasheet-8363642.pdf?src-supplier=Verical, ComponentLink10Description=https://datasheet.octopart.com/CRCW0603100KFKEA-Vishay-datasheet-508714.pdf?src-supplier=Farnell, ComponentLink10URL=https://datasheet.octopart.com/CRCW0603100KFKEA-Vishay-datasheet-508714.pdf?src-supplier=Farnell, ComponentLink11Description=https://datasheet.octopart.com/CRCW0603100KFKEA-Vishay-datasheet-17834126.pdf?src-supplier=TME, ComponentLink11URL=https://datasheet.octopart.com/CRCW0603100KFKEA-Vishay-datasheet-17834126.pdf?src-supplier=TME, Features=6309FeaturesType, Height=500um, Item Type=Resistor, Lead Free=5697LeadFree, Packaging=13Packaging, Pins=2NUMBER, Pricing="1=0.1, 10=0.019, 50=0.019, 100=0.009, 1000=0.007, 10000=0.004 (USD)", RoHS=Yes, RoHS Compliant=Yes, Stock=716604, Supplier=Mouser, Tolerance=1%, Voltage Rating (DC)=75V
R17 R25 R43 R51 R69 R77 R95 R103: library part RC0603FR-07390KL, "RES 390K OHM 1% 1/10W 0603", Case Code (Imperial)=0603, Case Code (Metric)=1608, LCSC Part Number=C137735, Manufacturer=Yageo, Max Operating Temperature=155°C, Max Power Dissipation=100mW, Min Operating Temperature=-55°C, Resistance Tolerance=1%, Resistor Type="Thick Film", Temperature Coefficient=100ppm/°C, Voltage Rating=50V, Working Voltage=75V, Case/Package=0603, ComponentLink1Description=https://datasheet.ciiva.com/11819/0900766b80f96399-11819357.pdf?src-supplier=Rs, ComponentLink1URL=https://datasheet.ciiva.com/11819/0900766b80f96399-11819357.pdf?src-supplier=Rs, ComponentLink2Description=https://datasheet.ciiva.com/5557/rc0603-5557952.pdf?src-supplier=Mouser, ComponentLink2URL=https://datasheet.ciiva.com/5557/rc0603-5557952.pdf?src-supplier=Mouser, ComponentLink3Description=https://datasheet.ciiva.com/2454/pyu-r-int-thick-7-2454247.pdf?src-supplier=Digikey, ComponentLink3URL=https://datasheet.ciiva.com/2454/pyu-r-int-thick-7-2454247.pdf?src-supplier=Digikey, ComponentLink4Description=https://datasheet.ciiva.com/2454/pyu-r-int-thick-7-2454248.pdf?src-supplier=Digikey, ComponentLink4URL=https://datasheet.ciiva.com/2454/pyu-r-int-thick-7-2454248.pdf?src-supplier=Digikey, ComponentLink5Description=https://datasheet.ciiva.com/2454/pyu-r-int-thick-7-2454246.pdf?src-supplier=Digikey, ComponentLink5URL=https://datasheet.ciiva.com/2454/pyu-r-int-thick-7-2454246.pdf?src-supplier=Digikey, Construction=Rectangular, Depth=0.8mm, Features="Moisture Resistant", Height=0.45mm, Item Type=Resistor, Lead Free=5697LeadFree, Length=1.6mm, Manufacturer Part Number=RC0603FR-07390KL, Military Standard=Not, Number of Terminations=2, Packaging="Tape and Reel", Pins=2, Power Rating=100mW, Pricing="1=0.104, 25=0.011, 50=0.009, 100=0.006 (USD)", Reach SVHC Compliant=Unknown, RoHS=Yes, RoHS Compliant=Yes, Series=RC, Stock=3700, Supplier=Avnet, Technology="THICK FILM", Termination=SMD/SMT, Tolerance=1%, Voltage Rating (AC)=50V, Voltage Rating (DC)=50V, Width=0.8mm
R18 R19 R44 R45 R70 R71 R96 R97: library part RC0603FR-0775KL, "RES 75K OHM 1% 1/10W 0603", Case Code (Imperial)=0603, Case Code (Metric)=1608, LCSC Part Number=C114636, Manufacturer=Yageo, Max Operating Temperature=155°C, Max Power Dissipation=100mW, Min Operating Temperature=-55°C, Resistance Tolerance=1%, Resistor Type="Thick Film", Temperature Coefficient=100ppm/°C, Voltage Rating=50V, Case/Package=0603, ComponentLink1Description=https://datasheet.ciiva.com/11808/0900766b80f96399-11808100.pdf?src-supplier=Rs, ComponentLink1URL=https://datasheet.ciiva.com/11808/0900766b80f96399-11808100.pdf?src-supplier=Rs, ComponentLink2Description=https://datasheet.ciiva.com/15189/getdatasheetpartid-326733-15189816.pdf?src-supplier=Verical, ComponentLink2URL=https://datasheet.ciiva.com/15189/getdatasheetpartid-326733-15189816.pdf?src-supplier=Verical, ComponentLink3Description=https://datasheet.ciiva.com/2455/pyu-r-int-thick-7-2455324.pdf?src-supplier=Digikey, ComponentLink3URL=https://datasheet.ciiva.com/2455/pyu-r-int-thick-7-2455324.pdf?src-supplier=Digikey, ComponentLink4Description=https://datasheet.ciiva.com/2455/pyu-r-int-thick-7-2455325.pdf?src-supplier=Digikey, ComponentLink4URL=https://datasheet.ciiva.com/2455/pyu-r-int-thick-7-2455325.pdf?src-supplier=Digikey, ComponentLink5Description=https://datasheet.ciiva.com/2455/pyu-r-int-thick-7-2455323.pdf?src-supplier=Digikey, ComponentLink5URL=https://datasheet.ciiva.com/2455/pyu-r-int-thick-7-2455323.pdf?src-supplier=Digikey, ComponentLink6Description=https://datasheet.ciiva.com/46395/443971-46395017.pdf?src-supplier=Element14, ComponentLink6URL=https://datasheet.ciiva.com/46395/443971-46395017.pdf?src-supplier=Element14, Construction=Rectangular, Depth=0.8mm, Features="Moisture Resistant", Height=0.45mm, Item Type=Resistor, Lead Free=5697LeadFree, Length=1.6mm, Manufacturer Part Number=RC0603FR-0775KL, Military Standard=Not, Number of Terminations=2, Packaging="Tape and Reel", Pins=2NUMBER, Power Rating=100mW, Pricing="5000=0.0015, 75000=0.0015, 250000=0.0014, 750000=0.0013, 2500000=0.0012 (USD)", Reach SVHC Compliant=No, RoHS=Yes, RoHS Compliant=Yes, Series=RC, Stock=550000, Supplier="Future Electronics", Technology="THICK FILM", Termination=SMD/SMT, Tolerance=1%, Voltage Rating (DC)=50V
R20 R46 R72 R98: library part RC0603FR-07140KL, "RES 140K OHM 1% 1/10W 0603", LCSC Part Number=C185372, Manufacturer=Yageo, Voltage Rating (DC)=50V, ComponentLink1Description=https://datasheet.ciiva.com/2453/pyu-r-int-thick-7-2453916.pdf?src-supplier=Digikey, ComponentLink1URL=https://datasheet.ciiva.com/2453/pyu-r-int-thick-7-2453916.pdf?src-supplier=Digikey, ComponentLink2Description=https://datasheet.ciiva.com/2453/pyu-r-int-thick-7-2453917.pdf?src-supplier=Digikey, ComponentLink2URL=https://datasheet.ciiva.com/2453/pyu-r-int-thick-7-2453917.pdf?src-supplier=Digikey, ComponentLink3Description=https://datasheet.ciiva.com/2453/pyu-r-int-thick-7-2453918.pdf?src-supplier=Digikey, ComponentLink3URL=https://datasheet.ciiva.com/2453/pyu-r-int-thick-7-2453918.pdf?src-supplier=Digikey, Item Type=Resistor, Lead Free=5697LeadFree, Manufacturer Part Number=RC0603FR-07140KL, Pricing="5000=0.0015, 50000=0.0014, 150000=0.0014, 375000=0.0013, 1000000=0.0012 (USD)", RoHS=Yes, Stock=215000, Supplier="Future Electronics"
R21 R22 R47 R48 R73 R74 R99 R100: library part CSR1206FTR130, "500mW Thick Film Resistors ±100ppm/℃ ±1% 130mΩ 1206 Chip Resistor - Surface Mount ROHS", LCSC Part Number=C346779, Manufacturer="SEI(Stackpole Elec)", Package=1206, ComponentLink1Description=LCSC, ComponentLink1URL=https://www.lcsc.com/product-detail/Chip-Resistor-Surface-Mount_SEI-Stackpole-Elec-CSR1206FTR130_C346779.html, Item Type=Resistor, Manufacturer Part Number=CSR1206FTR130
R23 R24 R49 R50 R75 R76 R101 R102: library part RL1206FR-7W0R15L, "RES 0.15 OHM 1% 1/2W 1206", LCSC Part Number=C859925, Manufacturer=YAGEO, Package=1206, ComponentLink1Description=LCSC, ComponentLink1URL=https://www.lcsc.com/product-detail/Chip-Resistor-Surface-Mount_YAGEO-RL1206FR-7W0R15L_C859925.html, Item Type=Resistor, Manufacturer Part Number=RL1206FR-7W0R15L
R26 R52 R78 R104: library part RC0603FR-0749K9L, "RES 49.9K OHM 1% 1/10W 0603", Case Code (Imperial)=0603, Case Code (Metric)=1608, LCSC Part Number=C114624, Manufacturer=Yageo, Max Operating Temperature=155°C, Max Power Dissipation=100mW, Min Operating Temperature=-55°C, Package Quantity=1, Resistance=49.9kR, Resistor Type="Thick Film", Supplier Part Number 1=311-49.9KHRCT-ND, Temperature Coefficient=100ppm/°C, Tolerance=1%, Voltage Rating=50V, Case/Package=0603, Category="Chip SMD Resistors", ComponentLink1Description=https://datasheet.ciiva.com/2454/pyu-r-int-thick-7-2454042.pdf?src-supplier=Digi-Key, ComponentLink1URL=https://datasheet.ciiva.com/2454/pyu-r-int-thick-7-2454042.pdf?src-supplier=Digi-Key, ComponentLink2Description=https://datasheet.ciiva.com/2454/pyu-r-int-thick-7-2454043.pdf?src-supplier=Digi-Key, ComponentLink2URL=https://datasheet.ciiva.com/2454/pyu-r-int-thick-7-2454043.pdf?src-supplier=Digi-Key, ComponentLink3Description=https://datasheet.ciiva.com/2454/pyu-r-int-thick-7-2454044.pdf?src-supplier=Digi-Key, ComponentLink3URL=https://datasheet.ciiva.com/2454/pyu-r-int-thick-7-2454044.pdf?src-supplier=Digi-Key, ComponentLink4Description=https://datasheet.ciiva.com/15189/getdatasheetpartid-323805-15189749.pdf?src-supplier=Verical, ComponentLink4URL=https://datasheet.ciiva.com/15189/getdatasheetpartid-323805-15189749.pdf?src-supplier=Verical, Construction=Rectangular, Depth=0.8mm, Features="Moisture Resistant", Height=0.022inch, Item Type=Resistor, Lead Free="Lead Free", Length=0.063inch, Manufacturer Part Number=RC0603FR-0749K9L, Military Standard=Not, Mount="Surface Mount", Number of Terminations=2, Packaging="Tape and Reel", Power Rating=100mW, Pricing 1="1=0.10000, 10=0.02400, 100=0.00970, 1000=0.00436, 2500=0.00378 (USD)", RoHS=Yes, RoHS Compliant=Yes, Series=RC, Size Code=0603, Stock 1=77863, Supplier 1=Digi-Key, Termination=SMD/SMT, Voltage Rating (DC)=50V, Width=0.031inch
R106 R111 R136 R141 R166 R171 R196 R201: library part RC0805FR-7W10KL, "RES 10K OHM 1% 1/4W 0805", LCSC Part Number=C723404, Manufacturer=Yageo, Supplier Part Number=49AK3472, Category="Chip SMD Resistors", Item Type=Resistor, Manufacturer Part Number=RC0805FR-7W10KL, Pricing="1=0.153, 25=0.038, 50=0.03, 100=0.02 (USD)", RoHS=Yes, Stock=5000, Supplier=Avnet
R107 R137 R167 R197: library part CRCW12060000Z0EA, "RES SMD 0 OHM JUMPER 1/4W 1206", Case Code (Imperial)=1206, Case Code (Metric)=3216, LCSC Part Number=C190124, Manufacturer=Vishay, Max Operating Temperature=155°C, Max Power Dissipation=250mW, Min Operating Temperature=-55°C, Package Quantity=5000, Ratings=AEC-Q200, Resistor Type="Thick Film", Temperature Coefficient=100ppm/°C, Tolerance=1%, Voltage Rating=200V, Case/Package=1206, ComponentLink1Description=https://datasheet.ciiva.com/7841/1720486-7841862.pdf?src-supplier=Element14, ComponentLink1URL=https://datasheet.ciiva.com/7841/1720486-7841862.pdf?src-supplier=Element14, Construction=Rectangular, Contact Plating=Tin, Depth=1.6mm, Features="Automotive AEC-Q200", Height=0.55mm, Item Type=Resistor, Lead Free=5697LeadFree, Length=3.2mm, Manufacturer Part Number=CRCW12060000Z0EA, Military Standard=Not, Number of Terminations=2, Packaging="Tape and Reel", Power Rating=250mW, Pricing="1=0.1, 10=0.039, 50=0.039, 100=0.018, 1000=0.013, 10000=0.007 (USD)", Radiation Hardening=No, Reach SVHC Compliant=Unknown, RoHS=Yes, RoHS Compliant=Yes, Series=CRCW, Stock=852938, Supplier=Mouser, Technology="THICK FILM", Termination=SMD/SMT, Voltage Rating (DC)=200V, Weight=0.000353oz, Width=1.6mm
R108 R138 R168 R198: library part CRGH0603F26K1, "RES SMD 26.1K OHM 1% 1/5W 0603", Case Code (Imperial)=0603, Case Code (Metric)=1608, LCSC Part Number=C4086912, Manufacturer="TE Connectivity", Max Operating Temperature=155°C, Max Power Dissipation=200mW, Min Operating Temperature=-55°C, Number of Resistors=1, Resistor Type="Thick Film,Power resistor", Temperature Coefficient=100ppm/°C, Tolerance=1%, Voltage Rating=50V, Case/Package=0603, ComponentLink1Description=http://www.mouser.com/ds/2/418/NG_DS_1773204-1_C-717624.pdf?src-supplier=Mouser, ComponentLink1URL=http://www.mouser.com/ds/2/418/NG_DS_1773204-1_C-717624.pdf?src-supplier=Mouser, ComponentLink2Description=https://www.te.com/commerce/DocumentDelivery/DDEController?Action=srchrtrv&amp;DocNm=1773204-1&amp;DocType=DS&amp;DocLang=English&src-supplier=Digikey, ComponentLink2URL=https://www.te.com/commerce/DocumentDelivery/DDEController?Action=srchrtrv&amp;DocNm=1773204-1&amp;DocType=DS&amp;DocLang=English&src-supplier=Digikey, ELV=Compliant, Height=0.45mm, Item Type=Resistor, Length=1.6mm, Manufacturer Part Number=CRGH0603F26K1, Mounting Technology="Surface Mount", Number of Terminations=2, Packaging="Tape and Reel", Power Rating=200mW, Pricing="20000=0.00865 (USD)", RoHS=Yes, RoHS Compliant=Yes, Series="CRGH, Neohm", Supplier=Digikey, Termination=Solder, Width=0.8mm
R109 R139 R169 R199: library part CRCW06037K15FKEA, "RES SMD 7.15K OHM 1% 1/10W 0603", LCSC Part Number=C844382, Manufacturer=Vishay, ComponentLink1Description=https://datasheet.ciiva.com/11810/0900766b80d98afc-11810198.pdf?src-supplier=Rs, ComponentLink1URL=https://datasheet.ciiva.com/11810/0900766b80d98afc-11810198.pdf?src-supplier=Rs, ComponentLink2Description=https://datasheet.ciiva.com/22707/1697337-22707757.pdf?src-supplier=Element14, ComponentLink2URL=https://datasheet.ciiva.com/22707/1697337-22707757.pdf?src-supplier=Element14, ComponentLink3Description=https://datasheet.ciiva.com/7679/1697337-7679142.pdf?src-supplier=Element14, ComponentLink3URL=https://datasheet.ciiva.com/7679/1697337-7679142.pdf?src-supplier=Element14, ComponentLink4Description=https://datasheet.ciiva.com/7679/1697337-7679143.pdf?src-supplier=Element14, ComponentLink4URL=https://datasheet.ciiva.com/7679/1697337-7679143.pdf?src-supplier=Element14, ComponentLink5Description=https://datasheet.ciiva.com/16397/dcrcwe3-16397317.pdf?src-supplier=Future+Electronics, ComponentLink5URL=https://datasheet.ciiva.com/16397/dcrcwe3-16397317.pdf?src-supplier=Future+Electronics, ComponentLink6Description=https://datasheet.ciiva.com/2466/dcrcwe3-2466245.pdf?src-supplier=Digikey, ComponentLink6URL=https://datasheet.ciiva.com/2466/dcrcwe3-2466245.pdf?src-supplier=Digikey, ComponentLink7Description=https://datasheet.ciiva.com/2466/dcrcwe3-2466246.pdf?src-supplier=Digikey, ComponentLink7URL=https://datasheet.ciiva.com/2466/dcrcwe3-2466246.pdf?src-supplier=Digikey, ComponentLink8Description=https://datasheet.ciiva.com/2466/dcrcwe3-2466247.pdf?src-supplier=Digikey, ComponentLink8URL=https://datasheet.ciiva.com/2466/dcrcwe3-2466247.pdf?src-supplier=Digikey, ComponentLink9Description=https://datasheet.ciiva.com/3257/dcrcwe3-3257899.pdf?src-supplier=Avnet, ComponentLink9URL=https://datasheet.ciiva.com/3257/dcrcwe3-3257899.pdf?src-supplier=Avnet, Item Type=Resistor, Lead Free=5697LeadFree, Manufacturer Part Number=CRCW06037K15FKEA, Pricing="1=0.1, 10=0.019, 50=0.019, 100=0.009, 1000=0.007, 10000=0.004 (USD)", RoHS=Yes, Stock=18619, Supplier=Mouser
R112 R142 R172 R202: library part CRCW08055K60FKEA, "RES SMD 5.6K OHM 1% 1/8W 0805", Case Code (Imperial)=0805, Case Code (Metric)=2012, LCSC Part Number=C844634, Manufacturer=Vishay, Max Operating Temperature=155°C, Max Power Dissipation=125mW, Min Operating Temperature=-55°C, Package Quantity=5000, Ratings=AEC-Q200, Resistance Tolerance=1%, Resistor Type="Thick Film", Supplier Part Number=6791572P, Temperature Coefficient=100ppm/°C, Voltage Rating=150V, Case/Package=0805, Category="Chip SMD Resistors", ComponentLink1Description=https://datasheet.ciiva.com/11811/0900766b80d98b26-11811062.pdf?src-supplier=Rs, ComponentLink1URL=https://datasheet.ciiva.com/11811/0900766b80d98b26-11811062.pdf?src-supplier=Rs, ComponentLink2Description=https://datasheet.ciiva.com/2525/dcrcwe3-2525722.pdf?src-supplier=Digi-Key, ComponentLink2URL=https://datasheet.ciiva.com/2525/dcrcwe3-2525722.pdf?src-supplier=Digi-Key, ComponentLink3Description=https://datasheet.ciiva.com/16767/70201119-16767127.pdf?src-supplier=Allied+Electronics, ComponentLink3URL=https://datasheet.ciiva.com/16767/70201119-16767127.pdf?src-supplier=Allied+Electronics, ComponentLink4Description=https://datasheet.ciiva.com/7841/1697337-7841861.pdf?src-supplier=Element14, ComponentLink4URL=https://datasheet.ciiva.com/7841/1697337-7841861.pdf?src-supplier=Element14, ComponentLink5Description=https://datasheet.ciiva.com/26317/fld-crcw-e3-data-en-26317147.pdf?src-supplier=Distrelec, ComponentLink5URL=https://datasheet.ciiva.com/26317/fld-crcw-e3-data-en-26317147.pdf?src-supplier=Distrelec, ComponentLink6Description=https://datasheet.ciiva.com/7841/1697337-7841690.pdf?src-supplier=Element14, ComponentLink6URL=https://datasheet.ciiva.com/7841/1697337-7841690.pdf?src-supplier=Element14, ComponentLink7Description=https://datasheet.ciiva.com/22683/1847332-22683327.pdf?src-supplier=Element14, ComponentLink7URL=https://datasheet.ciiva.com/22683/1847332-22683327.pdf?src-supplier=Element14, ComponentLink8Description=https://datasheet.ciiva.com/2525/dcrcwe3-2525723.pdf?src-supplier=Digi-Key, ComponentLink8URL=https://datasheet.ciiva.com/2525/dcrcwe3-2525723.pdf?src-supplier=Digi-Key, ComponentLink9Description=https://datasheet.ciiva.com/2525/dcrcwe3-2525724.pdf?src-supplier=Digi-Key, ComponentLink9URL=https://datasheet.ciiva.com/2525/dcrcwe3-2525724.pdf?src-supplier=Digi-Key, ComponentLink10Description=https://datasheet.ciiva.com/9065/dcrcwe3-9065422.pdf?src-supplier=Avnet, ComponentLink10URL=https://datasheet.ciiva.com/9065/dcrcwe3-9065422.pdf?src-supplier=Avnet, Contact Plating=Tin, Depth=1.25mm, Features="Automotive AEC-Q200", Height=0.45mm, Item Type=Resistor, Length=2mm, Manufacturer Part Number=CRCW08055K60FKEA, Number of Terminations=2, Packaging="Tape and Reel", Pins=2, Power Rating=125mW, Pricing="1250=0.024, 2500=0.013, 4000=0.015, 5000=0.011 (GBP)", Reach SVHC Compliant=Unknown, RoHS=Yes, RoHS Compliant=Yes, Series=CRCW, Stock=100250, Supplier=Rs, Technology="THICK FILM", Termination=SMD/SMT, Tolerance=1%, Voltage Rating (DC)=150V, Weight=0.000194oz, Width=1.25mm
R113 R143 R173 R203: library part RK73G1JTTD1002F, "RES 10K OHM 1% 1/10W 0603", Case Code (Imperial)=0603, Case Code (Metric)=1608, LCSC Part Number=C362180, Max Operating Temperature=125°C, Min Operating Temperature=-55°C, Power Rating=100mW, Supplier Part Number=2019-RK73G1JTTD1002FCT-ND, Temperature Coefficient=50ppm/°C, Tolerance=1%, Voltage Rating=75V, Case/Package=0603, Category="Chip SMD Resistors", ComponentLink1Description=LCSC, ComponentLink2Description=http://www.mouser.com/ds/2/219/RK73G-9863.pdf?src-supplier=Mouser, ComponentLink2URL=http://www.mouser.com/ds/2/219/RK73G-9863.pdf?src-supplier=Mouser, Construction=Rectangular, Depth=0.8mm, Item Type=Resistor, Length=1.6mm, Military Standard=Not, Packaging="Tape and Reel", Pricing="1=0.22, 10=0.118, 50=0.0812, 100=0.0699, 500=0.0513, 1000=0.04545 (USD)", RoHS=Yes, RoHS Compliant=Yes, Series=RK73G, Stock=249394, Supplier=Digi-Key, Termination=SMD/SMT
R114 R144 R174 R204: library part CR0603-FX-4991ELF, "RES SMD 4.99K OHM 1% 1/10W 0603", LCSC Part Number=C203645, Manufacturer=Bourns, Voltage Rating (DC)=50V, ComponentLink1Description=https://datasheet.ciiva.com/9122/chpreztr-9122757.pdf?src-supplier=Avnet, ComponentLink1URL=https://datasheet.ciiva.com/9122/chpreztr-9122757.pdf?src-supplier=Avnet, ComponentLink2Description=https://datasheet.ciiva.com/6547/chpreztr-6547333.pdf?src-supplier=Digikey, ComponentLink2URL=https://datasheet.ciiva.com/6547/chpreztr-6547333.pdf?src-supplier=Digikey, ComponentLink3Description=https://datasheet.ciiva.com/6547/chpreztr-6547335.pdf?src-supplier=Digikey, ComponentLink3URL=https://datasheet.ciiva.com/6547/chpreztr-6547335.pdf?src-supplier=Digikey, Item Type=Resistor, Manufacturer Part Number=CR0603-FX-4991ELF, Pricing="1=0.1, 10=0.014, 25=0.0108, 50=0.008, 100=0.0057, 250=0.00456, 500=0.00364, 1000=0.00268 (USD)", RoHS=Yes, RoHS Compliant=5897YesNo, Stock=84955, Supplier=Digikey, Thickness=457um
R115 R116 R145 R146 R175 R176 R205 R206: library part RC0402FR-070RL, "RES 0 OHM JUMPER 1/16W 0402", Case Code (Imperial)=0402, Case Code (Metric)=1005, LCSC Part Number=C106231, Manufacturer=Yageo, Max Operating Temperature=155°C, Max Power Dissipation=63mW, Min Operating Temperature=-55°C, Power Rating=62.5mW, Resistor Type="Thick Film", Supplier Part Number 1=603-RC0402FR-070RL, Temperature Coefficient=200ppm/°C, Tolerance=1%, Voltage Rating=50V, Case/Package=0402, ComponentLink1Description=https://datasheet.ciiva.com/8896/pyu-rc0402-51-rohs-l-6-8896149.pdf?src-supplier=Avnet, ComponentLink1URL=https://datasheet.ciiva.com/8896/pyu-rc0402-51-rohs-l-6-8896149.pdf?src-supplier=Avnet, ComponentLink2Description=https://datasheet.ciiva.com/16790/pyu-rc0402-51-rohs-l-6-r-16790444.pdf?src-supplier=Future+Electronics, ComponentLink2URL=https://datasheet.ciiva.com/16790/pyu-rc0402-51-rohs-l-6-r-16790444.pdf?src-supplier=Future+Electronics, Contact Plating=Tin,Matte, Features="Moisture Resistant", Height=0.35mm, Item Type=Resistors, Lead Free="Lead Free", Length=1mm, Manufacturer Part Number=RC0402FR-070RL, Mount="Surface Mount", Number of Terminations=2, Packaging="Tape and Reel", Pricing 1="1=0.10000, 10=0.01400, 50=0.01400, 100=0.00600, 1000=0.00300, 5000=0.00200, 10000=0.00100 (USD)", Radiation Hardening=No, Resistance=0R, RoHS=Yes, RoHS Compliant=Yes, Series=RC, Size Code=0402, Stock 1=8556842, Supplier 1=Mouser, Termination=SMD/SMT, Width=0.5mm
R117 R118 R119 R147 R148 R149 R177 R178 R179 R207 R208 R209: library part RC1206FR-071K65L, "RES 1.65K OHM 1% 1/4W 1206", LCSC Part Number=C488588, Manufacturer=Yageo, ComponentLink1Description=https://datasheet.ciiva.com/15159/getdatasheetpartid-45723-15159541.pdf?src-supplier=Verical, ComponentLink1URL=https://datasheet.ciiva.com/15159/getdatasheetpartid-45723-15159541.pdf?src-supplier=Verical, ComponentLink2Description=https://datasheet.ciiva.com/17086/pyu-rc1206-51-rohs-l-4-17086185.pdf?src-supplier=Future+Electronics, ComponentLink2URL=https://datasheet.ciiva.com/17086/pyu-rc1206-51-rohs-l-4-17086185.pdf?src-supplier=Future+Electronics, Item Type=Resistor, Manufacturer Part Number=RC1206FR-071K65L, Pricing="1=0.1, 10=0.038, 50=0.0244, 100=0.0206, 500=0.01434, 1000=0.01248 (USD)", RoHS=Yes, Stock=18321, Supplier=Digikey